# Altium PCB CW342_PCB.PcbDoc (part 3 of 3)
Units mil, origin at the board's own origin, x right, y up, seen from the top; angles counter-clockwise.
Board outline 3740.34 x 4080.75 mil, 4 copper layers (Top Layer, Layer 2 (GND), Layer 3, Bottom Layer), stack 23.756 mil thick; 89 components, 152 nets, 1082 pads, 424 vias.
Unrouted connection lines stored in the file: 58.
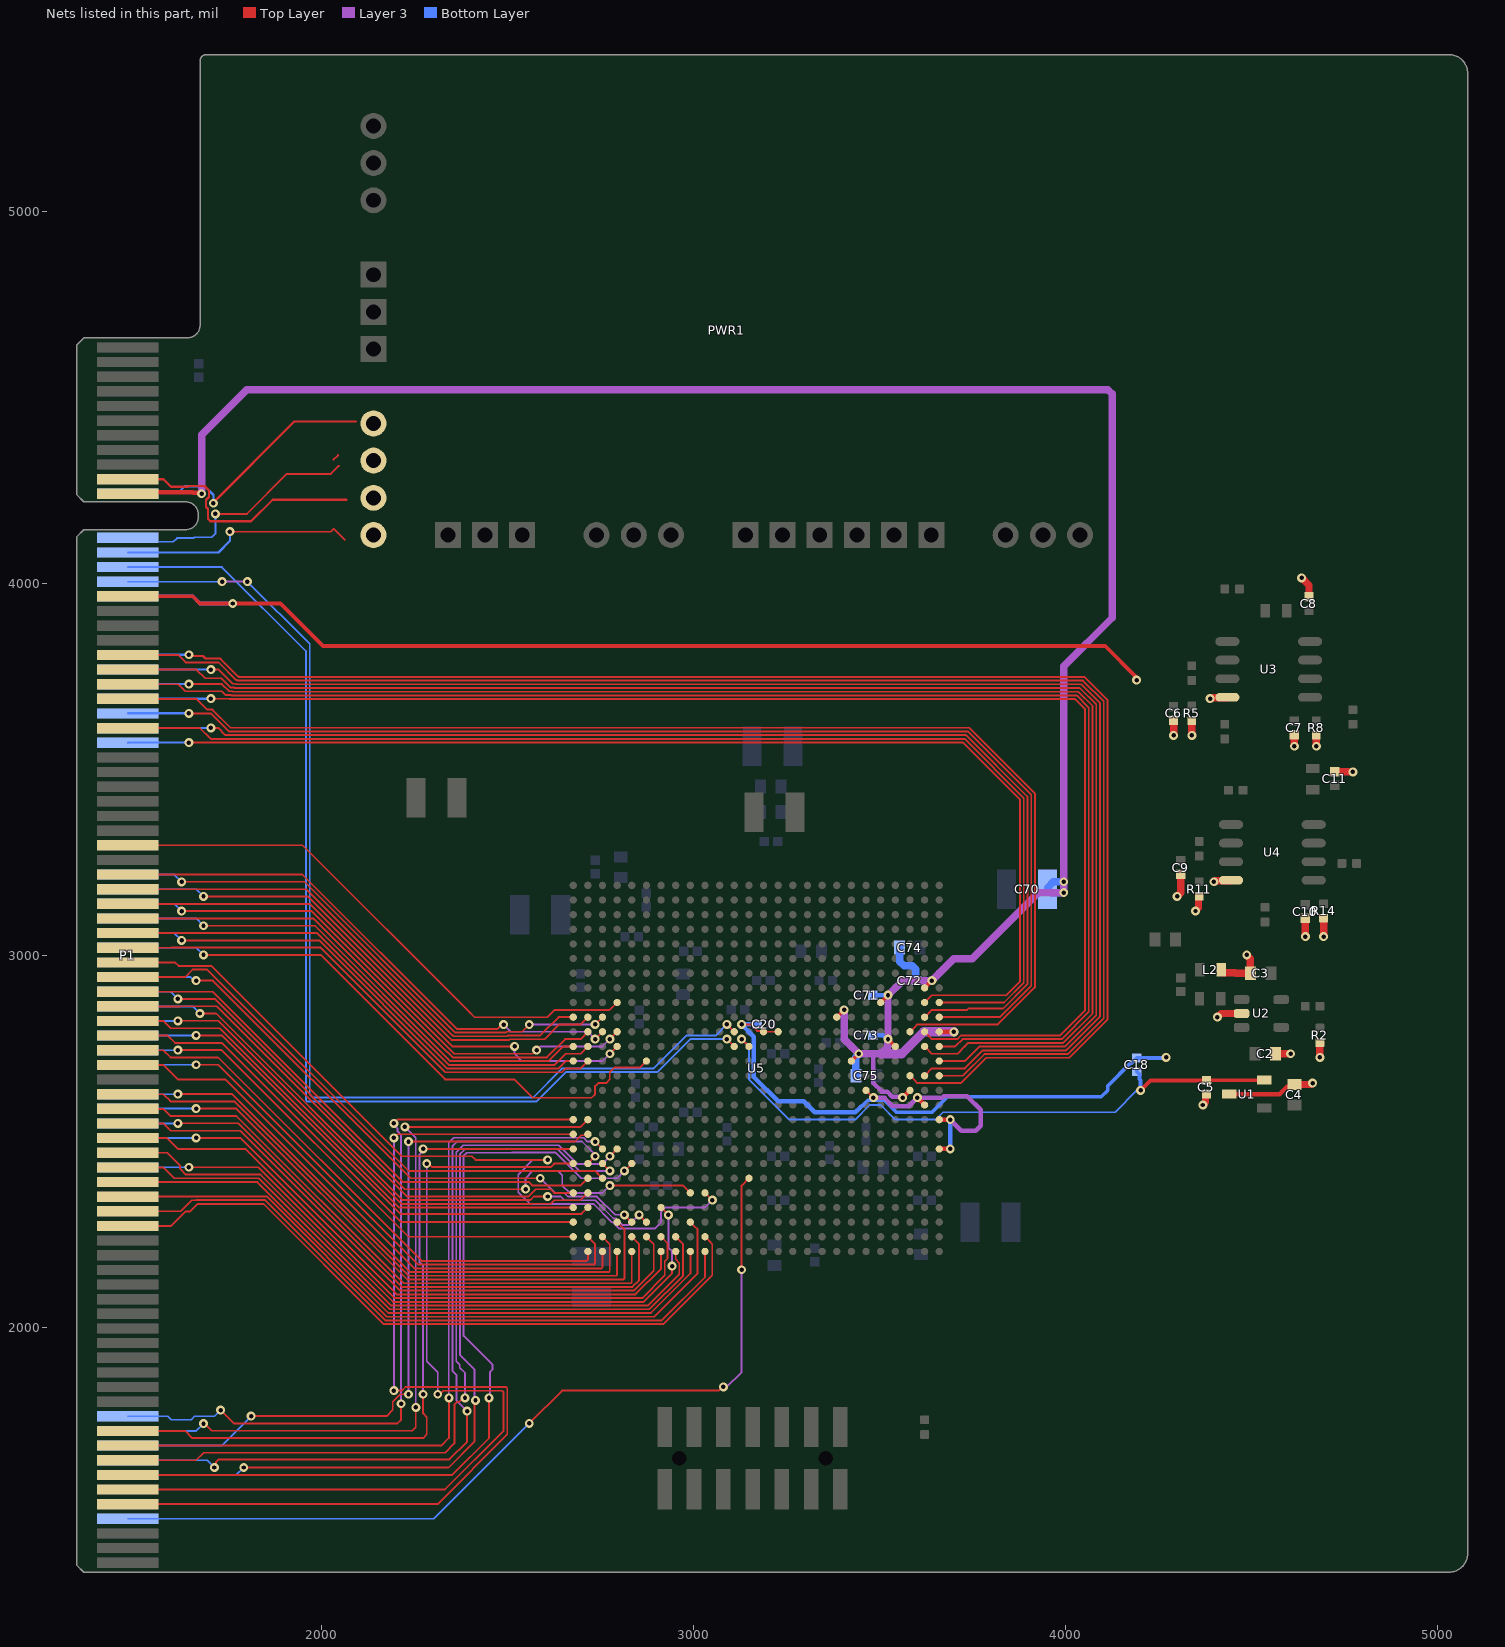
[diagram p5: the nets of this part, all layers, seen from the top]

## Via types
v1: diameter 24, hole 12, Top Layer to Bottom Layer, tented both sides, 423 vias
v2: diameter 24, hole 12, Top Layer to Bottom Layer, 1 vias

## Nets (pads, with @x,y where several pads share a name; then routed paths per layer and width w, separated by ;. In a path a pad name is that pad's centre, name@x,y a point inside that pad or via, vN(x,y) a via of type N, cw(c..) or ccw(c..) an arc to the next point about the centre after c; other vN are vias at no path point) (continued)
OT_IOB4: P1.A20 U5.C14 | length 4153.5
  Top Layer w5: 1729.87,3796.79 1775.72,3750.94 1777.47,3750.94 1778.73,3749.68 4051.7,3749.68 4113.54,3687.85 4113.54,2827.9 4011.07,2725.43 3787.18,2725.43 3719.23,2657.48 3602.36,2657.48 3594.94,2664.9 U5.C14@3582.68,2677.17
  Top Layer w6: v1(1643.7,3809.06) 1647.14,3805.61 1681.51,3805.61 1688.19,3798.93 1727.73,3798.93 1729.87,3796.79
  Bottom Layer w6: P1.A20@1480,3808.62 1480.43,3809.06 v1(1643.7,3809.06)
OT_IOB5: P1.B20 U5.A14 | length 4033.2
  Top Layer w5: P1.B20@1480,3808.62 1614.61,3808.62 1634.8,3788.43 1723.39,3788.43 1770.87,3740.94 1773.33,3740.94 1774.59,3739.68 4047.56,3739.68 4103.54,3683.7 4103.54,2832.04 4006.93,2735.43 3783.04,2735.43 3724.77,2677.17 U5.A14@3661.42,2677.17
OT_IOB6: P1.A21 U5.B14 | length 4032.1
  Top Layer w5: v1(1702.76,3768.93) 1703.52,3769.68 1723.07,3769.68 1761.81,3730.94 1769.19,3730.94 1770.45,3729.68 4043.42,3729.68 4093.54,3679.56 4093.54,2836.19 4002.79,2745.43 3778.9,2745.43 3730.32,2696.85 3641.73,2696.85 U5.B14@3622.05,2677.17
  Bottom Layer w6: P1.A21@1480,3769.25 1702.43,3769.25 v1(1702.76,3768.93)
OT_IOB7: P1.B21 U5.A13 | length 3950.9
  Top Layer w5: P1.B21@1480,3769.25 1663.98,3769.25 1687.21,3746.02 1731.04,3746.02 1756.11,3720.94 1765.04,3720.94 1766.3,3719.68 4039.28,3719.68 4083.54,3675.42 4083.54,2840.33 3998.65,2755.43 3769.21,2755.43 3730.32,2716.54 U5.A13@3661.42,2716.54
OT_IOB8: P1.A22 U5.B12 | length 3949.5
  Top Layer w5: v1(1643.7,3730.32) 1732.6,3730.32 1751.97,3710.94 1760.9,3710.94 1762.16,3709.68 4035.13,3709.68 4073.54,3671.28 4073.54,2844.47 3994.51,2765.43 3739.84,2765.43 3730.32,2755.91 3710.63,2736.22 3641.73,2736.22 U5.B12@3622.05,2755.91
  Bottom Layer w6: P1.A22@1480,3729.88 1480.43,3730.32 v1(1643.7,3730.32)
OT_IOB9: P1.B22 U5.A12 | length 3868.6
  Top Layer w5: P1.B22@1480,3729.88 1614.61,3729.88 1633.67,3710.82 1732.26,3710.82 1742.13,3700.94 1756.76,3700.94 1758.02,3699.68 4030.99,3699.68 4063.54,3667.13 4063.54,2848.61 3990.36,2775.43 3724.02,2775.43 3704.49,2755.91 U5.A12@3661.42,2755.91
OT_IOB10: P1.A23 U5.B11 | length 3874.9
  Top Layer w5: v1(1702.76,3690.94) 1752.62,3690.94 1753.88,3689.68 4026.85,3689.68 4053.54,3662.99 4053.54,2852.76 3986.22,2785.43 3719.88,2785.43 3710.04,2775.59 3641.73,2775.59 3634.31,2783.01 U5.B11@3622.05,2795.28
  Bottom Layer w6: P1.A23@1485.51,3685 P1.A23@1480,3690.51 1480.43,3690.94 v1(1702.76,3690.94)
OT_IOB11: P1.B23 U5.C11 | length 3450.9
  Top Layer w5: P1.B23@1480,3690.51 1663.82,3690.51 1692.76,3661.57 1706.9,3661.57 1755.64,3612.83 3742.05,3612.83 3918.61,3436.27 3918.61,2914.67 3818.9,2814.96 3602.36,2814.96 3594.94,2807.54 U5.C11@3582.68,2795.28
OT_IOB12: P1.A24 U5.A10 | length 3315.1
  Top Layer w5: v1(1643.7,3651.57) 1702.76,3651.57 1751.5,3602.83 3737.91,3602.83 3908.61,3432.13 3908.61,2918.82 3840.64,2850.84 3824.44,2834.65 U5.A10@3661.42,2834.65
  Bottom Layer w6: P1.A24@1480,3651.14 1480.43,3651.57 v1(1643.7,3651.57)
OT_IOC0: P1.A50 U5.AD25 | length 1595.4
  Top Layer w5: v1(1614.17,2627.95) 1760.57,2627.95 2239.33,2149.19 2772.66,2149.19 2775.59,2152.12 2775.59,2224.41 U5.AD25@2755.91,2244.09
  Bottom Layer w5: P1.A50@1480,2627.52 1613.74,2627.52 v1(1614.17,2627.95)
OT_IOC1: P1.B50 U5.AC26 | length 1581.4
  Top Layer w5: P1.B50@1480,2627.52 1575.24,2627.52 1594.67,2608.08 1766.3,2608.08 2235.19,2139.19 2792.35,2139.19 2795.28,2142.12 U5.AC26@2795.28,2204.72
OT_IOC2: P1.A51 U5.AC24 | length 1686.1
  Top Layer w5: v1(1663.39,2588.58) 1771.65,2588.58 2231.05,2129.19 2812.03,2129.19 2814.96,2132.12 2814.96,2263.78 U5.AC24@2795.28,2283.46
  Bottom Layer w5: P1.A51@1480,2588.15 1480.43,2588.58 v1(1663.39,2588.58)
OT_IOC3: P1.B51 U5.AB26 | length 1632.7
  Top Layer w5: P1.B51@1480,2588.15 1575.24,2588.15 1594.67,2568.71 1771.84,2568.71 2221.36,2119.19 2831.72,2119.19 2834.65,2122.12 U5.AB26@2834.65,2204.72
OT_IOC4: P1.A52 U5.AB25 | length 1689.3
  Top Layer w5: v1(1614.17,2549.21) 1775.95,2549.21 2215.98,2109.19 2836.29,2109.19 2854.33,2127.23 2854.33,2224.41 U5.AB25@2834.65,2244.09
  Bottom Layer w5: P1.A52@1480,2548.78 1613.74,2548.78 v1(1614.17,2549.21)
OT_IOC5: P1.B52 U5.AA25 | length 1721.8
  Top Layer w5: P1.B52@1480,2548.78 1575.24,2548.78 1594.67,2529.34 1781.68,2529.34 2211.83,2099.19 2840.43,2099.19 2893.7,2152.46 2893.7,2224.41 U5.AA25@2874.02,2244.09
OT_IOC6: P1.B53 U5.Y25 | length 1760.9
  Top Layer w5: P1.B53@1480,2509.41 1585.08,2509.41 1614.17,2480.32 1795.64,2480.32 2196.76,2079.19 2862.29,2079.19 2923.41,2140.31 2923.41,2177.89 2930.73,2185.2 2930.73,2226.75 U5.Y25@2913.39,2244.09
OT_IOC7: P1.B54 U5.W26 | length 1757.1
  Top Layer w5: P1.B54@1480,2470.04 1585.08,2470.04 1619.98,2435.14 1619.98,2427.25 1635.93,2411.3 1836.37,2411.3 2188.48,2059.19 2877.65,2059.19 2962.41,2143.96 2962.41,2173.43 2952.76,2183.09 U5.W26@2952.76,2204.72
OT_IOC8: P1.B55 U5.W25 | length 1800.4
  Top Layer w5: P1.B55@1480,2430.67 1575.24,2430.67 1604.61,2401.3 1832.23,2401.3 2184.34,2049.19 2881.79,2049.19 2972.44,2139.84 2972.44,2224.41 2965.02,2231.83 U5.W25@2952.76,2244.09
OT_IOC9: P1.B56 U5.V26 | length 1761.3
  Top Layer w5: P1.B56@1480,2391.3 1828.08,2391.3 2180.2,2039.19 2885.93,2039.19 2992.13,2145.38 U5.V26@2992.13,2204.72
OT_IOC10: P1.B57 U5.V24 | length 1860.2
  Top Layer w5: P1.B57@1480,2351.93 1605.85,2351.93 1606.22,2352.3 1659.02,2352.3 1659.24,2352.52 1852.72,2352.52 2176.05,2029.19 2895.33,2029.19 3011.81,2145.67 3011.81,2263.78 3004.39,2271.2 U5.V24@2992.13,2283.46
OT_IOC11: P1.B58 U5.U26 | length 1815.4
  Top Layer w5: P1.B58@1480,2312.56 1621.63,2312.56 1651.37,2342.3 1663.17,2342.3 1663.39,2342.52 1848.58,2342.52 2171.91,2019.19 2915.39,2019.19 3031.5,2135.29 U5.U26@3031.5,2204.72
OT_IOC12: P1.B59 U5.U25 | length 1895.6
  Top Layer w5: P1.B59@1480,2273.19 1596.4,2273.19 1635.53,2312.32 1647.33,2312.32 1667.53,2332.52 1844.44,2332.52 2167.77,2009.19 2919.54,2009.19 3051.18,2140.83 3051.18,2224.41 3043.76,2231.83 U5.U25@3031.5,2244.09
OT_IOR0_USR_DBG_TMS: P1.A42 U5.AB24 | length 1627.6
  Top Layer w5: v1(1663.39,2933.07) 1708.3,2933.07 2239.79,2401.57 v1(2588.58,2401.57) ; v1(2814.96,2303.15) U5.AB24@2834.65,2283.46
  Layer 3 w5: v1(2588.58,2401.57) 2627.8,2362.36 2653.02,2362.36 2663.18,2352.2 2740.68,2352.2 2789.73,2303.15 v1(2814.96,2303.15)
  Bottom Layer w5: P1.A42@1480,2942.48 1648.84,2942.48 1658.24,2933.07 v1(1663.39,2933.07)
OT_IOR1_USR_DBG_TDO: P1.B42 U5.AD21 | length 1516.6
  Top Layer w5: P1.B42@1480,2942.48 1633.42,2942.48 1653.54,2962.6 1692.91,2962.6 2234.25,2421.26 2736.22,2421.26 2743.64,2413.84 U5.AD21@2755.91,2401.57
OT_IOR2_USR_DBG_TDI: P1.A43 U5.V22 | length 1826.8
  Top Layer w5: v1(1614.17,2883.61) 1712.85,2883.61 2224.41,2372.05 v1(2549.21,2372.05) ; v1(2775.59,2381.89) 2972.44,2381.89 U5.V22@2992.13,2362.2
  Layer 3 w5: v1(2549.21,2372.05) 2549.21,2401.57 2568.9,2421.26 2635.84,2421.26 2647.64,2409.47 2647.64,2381.89 2667.32,2362.2 2755.91,2362.2 v1(2775.59,2381.89)
  Bottom Layer w5: P1.A43@1480,2903.11 1594.92,2903.11 1614.17,2883.86 v1(1614.17,2883.61)
OT_IOR3_USR_DBG_TCK: P1.B43 U5.AE21 | length 1460.4
  Top Layer w5: P1.B43@1480,2903.11 1707.49,2903.11 2219.05,2391.55 2557.29,2391.55 2566.76,2382.07 2697.04,2382.07 U5.AE21@2716.54,2401.57
OT_IOR4_USR_DBG_TRST: P1.A44 U5.AA24 | length 1665
  Top Layer w5: v1(1673.23,2844.49) 1716.9,2844.49 2218.84,2342.55 2561.43,2342.55 2571.25,2352.36 v1(2608.27,2352.36) ; v1(2854.33,2303.15) U5.AA24@2874.02,2283.46
  Layer 3 w5: v1(2608.27,2352.36) 2643.34,2352.36 2653.5,2342.2 2736.54,2342.2 2785.46,2293.28 2787.81,2293.28 2787.94,2293.15 2792.09,2293.15 2809.26,2275.98 2827.16,2275.98 v1(2854.33,2303.15)
  Bottom Layer w5: P1.A44@1480,2863.74 1653.98,2863.74 v1(1673.23,2844.49)
OT_IOR5: P1.B44 U5.AF22 | length 1421.1
  Top Layer w5: P1.B44@1480,2863.74 1620.62,2863.74 1620.87,2863.99 1718.33,2863.99 2229.77,2352.55 2557.29,2352.55 2576.6,2371.86 2616.34,2371.86 2626,2362.2 U5.AF22@2677.17,2362.2
OT_IOR6: P1.A45 U5.AE22 | length 1452.9
  Top Layer w5: v1(1614.17,2824.8) 1722.44,2824.8 2214.7,2332.55 2565.57,2332.55 2565.89,2332.86 2616.34,2332.86 2625.84,2342.36 2696.69,2342.36 2704.27,2349.94 U5.AE22@2716.54,2362.2
  Bottom Layer w5: P1.A45@1480,2824.37 1613.74,2824.37 v1(1614.17,2824.8)
OT_IOR7: P1.B45 U5.AF23 | length 1405.1
  Top Layer w5: P1.B45@1480,2824.37 1575.24,2824.37 1594.67,2804.93 1727.08,2804.93 2209.47,2322.55 2599.4,2322.55 2599.69,2322.83 U5.AF23@2677.17,2322.83
OT_IOR8: P1.A46 U5.AE23 | length 1442.7
  Top Layer w5: v1(1663.39,2785.43) 1732.44,2785.43 2212.38,2305.49 2699.19,2305.49 U5.AE23@2716.54,2322.83
  Bottom Layer w5: P1.A46@1480,2785 1603.9,2785 1604.33,2785.43 v1(1663.39,2785.43)
OT_IOR9: P1.B46 U5.AF24 | length 1404.9
  Top Layer w5: P1.B46@1480,2785 1587.03,2785 1606.47,2765.56 1732.63,2765.56 2214.72,2283.46 U5.AF24@2677.17,2283.46
OT_IOR10: P1.A47 U5.AF25 | length 1405.3
  Top Layer w5: v1(1614.17,2746.06) 1732.28,2746.06 2234.25,2244.09 U5.AF25@2677.17,2244.09
  Bottom Layer w5: P1.A47@1480,2745.63 1613.74,2745.63 v1(1614.17,2746.06)
OT_IOR11: P1.B47 U5.AE26 | length 1495
  Top Layer w5: P1.B47@1480,2745.63 1575.24,2745.63 1594.67,2726.19 1722.63,2726.19 2269.63,2179.19 2713.61,2179.19 2716.54,2182.12 U5.AE26@2716.54,2204.72
OT_IOR12: P1.A48 U5.AE25 | length 1560.4
  Top Layer w5: v1(1663.39,2706.69) 1722.44,2706.69 2259.94,2169.19 2733.29,2169.19 2736.22,2172.12 2736.22,2224.41 U5.AE25@2716.54,2244.09
  Bottom Layer w5: P1.A48@1480,2706.26 1480.43,2706.69 v1(1663.39,2706.69)
OT_IOR13: P1.B48 U5.AD26 | length 1526.6
  Top Layer w5: P1.B48@1499.69,2706.26 1575.24,2706.26 1614.17,2667.32 1742.13,2667.32 2250.26,2159.19 2752.98,2159.19 2755.91,2162.12 U5.AD26@2755.91,2204.72
OT_PORN: P1.A53 U5.Y26 | length 1683
  Top Layer w5: v1(1663.39,2509.84) 1781.5,2509.84 2202.15,2089.19 2844.58,2089.19 2913.39,2158 U5.Y26@2913.39,2204.72
  Bottom Layer w5: P1.A53@1480,2509.41 1480.43,2509.84 v1(1663.39,2509.84)
OT_SPI_DEV_CLK: P1.A35 U5.AD10 | length 1469.3
  Top Layer w5: v1(1624.02,3198.57) 1954.61,3198.57 2360.05,2793.13 2496.03,2793.13 2498.31,2795.41 2539.5,2795.41 2558.93,2814.83 v1(2559.06,2814.83) ; v1(2736.22,2814.96) U5.AD10@2755.91,2834.65
  Layer 3 w5: v1(2559.06,2814.83) 2559.12,2814.9 2736.16,2814.9 v1(2736.22,2814.96)
  Bottom Layer w5: P1.A35@1480,3218.07 1604.76,3218.07 1624.02,3198.82 v1(1624.02,3198.57)
OT_SPI_DEV_CS_L: P1.A40 U5.AA13 | length 1625.8
  Top Layer w5: v1(1683.07,3001.97) 1998.03,3001.97 2332.68,2667.32 2519.27,2667.32 2519.68,2666.91 2521.7,2664.89 2529.32,2657.27 2568.48,2618.11 2726.38,2618.11 2736.22,2627.95 2736.22,2649.29 2744.41,2657.48 2765.75,2657.48 2775.59,2667.32 2775.59,2687.01 2787.78,2699.19 2856.67,2699.19 U5.AA13@2874.02,2716.54
  Bottom Layer w5: P1.A40@1480,3021.22 1663.82,3021.22 v1(1683.07,3001.97)
OT_SPI_DEV_D0: P1.A36 U5.AE10 | length 1430
  Top Layer w5: v1(1683.07,3159.2) 1963.21,3159.2 2344.67,2777.74 2345.91,2777.74 2350.53,2773.13 2504.31,2773.13 2506.59,2775.41 2600.19,2775.41 2639.75,2814.96 2696.85,2814.96 U5.AE10@2716.54,2834.65
  Bottom Layer w5: P1.A36@1480,3178.7 1663.57,3178.7 v1(1683.07,3159.2)
OT_SPI_DEV_D1: P1.A37 U5.AC11 | length 1506.7
  Top Layer w5: v1(1624.02,3119.83) 1974.3,3119.83 2357.72,2736.41 2569.08,2736.41 v1(2578.74,2746.06) ; v1(2775.59,2775.59) U5.AC11@2795.28,2795.28
  Layer 3 w5: v1(2578.74,2746.06) 2588.58,2755.91 2755.91,2755.91 v1(2775.59,2775.59)
  Bottom Layer w5: P1.A37@1480,3139.33 1604.76,3139.33 1624.02,3120.08 v1(1624.02,3119.83)
OT_SPI_DEV_D2: P1.A38 U5.AF12 | length 1372.4
  Top Layer w5: v1(1683.07,3080.46) 1982.89,3080.46 2346.95,2716.41 2610.49,2716.41 2649.99,2755.91 U5.AF12@2677.17,2755.91
  Bottom Layer w5: P1.A38@1480,3099.96 1663.57,3099.96 v1(1683.07,3080.46)
OT_SPI_DEV_D3: P1.A39 U5.AF13 | length 1356.5
  Top Layer w5: v1(1624.02,3041.09) 1993.98,3041.09 2338.67,2696.41 2637.35,2696.41 2657.48,2716.54 U5.AF13@2677.17,2716.54
  Bottom Layer w5: P1.A39@1480,3060.59 1604.76,3060.59 1624.02,3041.34 v1(1624.02,3041.09)
OT_SPI_HOST_CLK: P1.B35 U5.AD11 | length 1477
  Top Layer w5: P1.B35@1480,3218.07 1949.25,3218.07 2364.2,2803.13 2474.29,2803.13 2485.99,2814.83 v1(2490.16,2814.83) ; v1(2736.22,2775.59) U5.AD11@2755.91,2795.28
  Layer 3 w5: v1(2490.16,2814.83) 2509.71,2795.28 2716.54,2795.28 v1(2736.22,2775.59)
OT_SPI_HOST_CS_L: P1.B40 U5.AE13 | length 1387.9
  Top Layer w5: P1.B40@1480,3021.22 1596.01,3021.22 1596.26,3021.47 1998.22,3021.47 2333.28,2686.41 2647.04,2686.41 2657.48,2696.85 2696.85,2696.85 U5.AE13@2716.54,2716.54
OT_SPI_HOST_D0: P1.B36 U5.AF10 | length 1382.4
  Top Layer w5: P1.B36@1480,3178.7 1959.09,3178.7 2352.36,2785.43 2353.61,2785.43 2355.91,2783.13 2500.17,2783.13 2502.45,2785.41 2588.56,2785.41 2637.8,2834.65 U5.AF10@2677.17,2834.65
OT_SPI_HOST_D1: P1.B37 U5.AC12 | length 1518.2
  Top Layer w5: P1.B37@1480,3139.33 1968.94,3139.33 2352.36,2755.91 v1(2519.68,2755.91) ; v1(2775.59,2736.22) U5.AC12@2795.28,2755.91
  Layer 3 w5: v1(2519.68,2755.91) 2519.68,2736.22 2539.37,2716.54 2755.91,2716.54 v1(2775.59,2736.22)
OT_SPI_HOST_D2: P1.B38 U5.AE11 | length 1419.8
  Top Layer w5: P1.B38@1480,3099.96 1978.78,3099.96 2337.27,2741.47 2338.52,2741.47 2353.58,2726.41 2606.34,2726.41 2655.53,2775.59 2696.85,2775.59 U5.AE11@2716.54,2795.28
OT_SPI_HOST_D3: P1.B39 U5.AE12 | length 1403.7
  Top Layer w5: P1.B39@1480,3060.59 1988.62,3060.59 2342.81,2706.41 2627.67,2706.41 2657.48,2736.22 2696.85,2736.22 U5.AE12@2716.54,2755.91
PGOOD_VCCINT: P1.B10 PWR1.9 | length 712.6
  Top Layer w6: P1.B10@1480,4281.06 1575.61,4281.06 1595.61,4261.06 1640.84,4261.06 1642.78,4263 1685.49,4263 1698,4250.49 1698,4233.5 1689.71,4225.21 1689.71,4206.4 1695,4201.11 1695,4174.51 1701.51,4168 1811,4168 1869,4226 2067,4226
PLL_CLK1: P1.A55 U5.Y23 | length 1834.1
  Top Layer w5: v1(1643.7,2431.1) 1830.71,2431.1 2192.62,2069.19 2866.43,2069.19 2942.91,2145.67 v1(2942.91,2165.35) ; U5.Y23@2913.39,2322.83 v1(2933.07,2303.15)
  Layer 3 w5: v1(2933.07,2303.15) 2933.07,2214.57 2942.91,2204.72 v1(2942.91,2165.35)
  Bottom Layer w5: P1.A55@1480,2430.67 1480.43,2431.1 v1(1643.7,2431.1)
PLL_CLK2: P1.B33 U5.AC9 | length 1523.3
  Top Layer w5: P1.B33@1480,3296.81 1949.25,3296.81 2398.47,2847.6 2411.73,2834.33 2607.95,2834.33 2627.8,2854.17 2775.43,2854.17 U5.AC9@2795.28,2874.02
PMOD2_IO4_3V3: P1.A25 U5.B10 | length 3313.3
  Top Layer w5: v1(1702.76,3612.2) 1722.76,3612.2 1742.13,3592.83 3733.76,3592.83 3898.61,3427.99 3898.61,2922.96 3833.57,2857.92 3739.44,2857.92 3735.86,2854.33 3641.73,2854.33 3634.31,2846.91 U5.B10@3622.05,2834.65
  Bottom Layer w6: P1.A25@1480,3611.77 1702.32,3611.77 v1(1702.76,3612.2)
PMOD2_IO7_3V3: P1.B25 U5.A9 | length 3232.4
  Top Layer w5: P1.B25@1480,3611.77 1673.66,3611.77 1702.6,3582.83 3729.62,3582.83 3888.61,3423.85 3888.61,2927.1 3835.53,2874.02 U5.A9@3661.42,2874.02
PMOD2_IO8_3V3: P1.A26 U5.B9 | length 3230.9
  Top Layer w5: v1(1643.7,3572.83) 3725.48,3572.83 3878.61,3419.7 3878.61,2931.24 3841.07,2893.7 3641.73,2893.7 3634.31,2886.28 U5.B9@3622.05,2874.02
  Bottom Layer w6: P1.A26@1480,3572.4 1480.43,3572.83 v1(1643.7,3572.83)
PWR_EN: P1.A13 PWR1.10 | length 636.5
  Top Layer w5: v1(1754,4140) 2025,4140 2033,4148 2063,4118
  Bottom Layer w6: P1.A13@1480,4084.21 1723.21,4084.21 1754,4115 v1(1754,4140)
USB_CLK0: P1.A79 U5.P21 | length 2345.3
  Top Layer w5: v1(2559.06,1742.13) 2647.48,1830.55 3068.28,1830.55 3078.28,1840.55 v1(3080.71,1840.55) ; v1(3129.92,2155.51) 3129.92,2381.89 U5.P21@3149.61,2401.57
  Layer 3 w5: v1(3080.71,1840.55) 3083.56,1837.7 3087.7,1837.7 3129.92,1879.92 v1(3129.92,2155.51)
  Bottom Layer w5: P1.A79@1480,1485.79 2302.72,1485.79 v1(2559.06,1742.13)
USR_DBG_nRST: P1.B41 U5.U22 | length 2128.6
  Top Layer w5: P1.B41@1480,2981.85 1480.39,2981.46 1607.1,2981.46 1615.94,2972.63 1704.52,2972.63 2216.52,2460.63 2404.91,2460.63 2414.73,2450.82 v1(2608.27,2450.82) ; U5.U22@3031.5,2362.2 v1(3051.18,2342.52)
  Layer 3 w5: v1(2608.27,2450.82) 2568.93,2450.82 2529.53,2411.42 2529.53,2364.16 2561.48,2332.2 2732.39,2332.2 2781.32,2283.28 2783.67,2283.28 2800.97,2265.98 2895.9,2265.98 2913.39,2283.46 2913.39,2311.04 2925.36,2323.02 3031.68,2323.02 v1(3051.18,2342.52)
USRUSB_OE: P1.B77 U5.AF20 | length 2396
  Top Layer w5: P1.B77@1480,1564.53 2332.24,1564.53 2489.5,1721.78 2489.5,1827.31 2486.57,1830.24 2327.66,1830.24 2318.13,1820.71 v1(2312.99,1820.71) ; v1(2283.46,2440.94) 2288.61,2440.94 2298.24,2431.32 2616.34,2431.32 2625.97,2440.94 U5.AF20@2677.17,2440.94
  Layer 3 w5: v1(2283.46,2440.94) 2283.46,1909.45 2312.99,1879.92 v1(2312.99,1820.71)
USRUSB_PWREN: P1.A72 U5.AF17 | length 2059.7
  Top Layer w5: v1(1729.16,1777.91) 1764.94,1742.13 2204.72,1742.13 2214.57,1751.97 v1(2214.57,1795.15) ; v1(2194.88,2549.21) 2204.73,2559.06 U5.AF17@2677.17,2559.06
  Layer 3 w5: v1(2194.88,2549.21) 2194.88,2544.07 2204.91,2534.04 2204.91,2527.39 2214.57,2517.73 v1(2214.57,1795.15)
  Bottom Layer w5: P1.A72@1480,1761.38 1586.6,1761.38 1595.83,1752.15 1649.61,1752.15 1658.84,1761.38 1712.63,1761.38 v1(1729.16,1777.91)
USRUSB_RCV: P1.A76 U5.AD20 | length 2221.5
  Top Layer w5: v1(1791.34,1623.77) 2342.27,1623.77 2411.42,1692.91 2411.42,1801.03 v1(2414.43,1804.05) ; U5.AD20@2755.91,2440.94 v1(2775.59,2421.26)
  Layer 3 w5: v1(2414.43,1804.05) 2411.42,1807.06 2411.42,1887.81 2372.52,1926.71 2372.52,2466.33 2386.35,2480.16 2507.87,2480.16 2508.02,2480.32 2634.01,2480.32 2693.06,2421.26 v1(2775.59,2421.26)
  Bottom Layer w5: P1.A76@1480,1603.9 1771.22,1603.9 1791.09,1623.77 v1(1791.34,1623.77)
USRUSB_SOFTCN: P1.B75 U5.AC19 | length 2185.3
  Top Layer w5: P1.B75@1480,1643.27 1662.95,1643.27 1683.23,1663.54 2332.83,1663.54 2357.71,1688.42 2357.71,1792.83 2365.36,1800.48 2370.82,1800.48 2381.08,1810.74 v1(2386.22,1810.74) ; v1(2775.59,2460.63) U5.AC19@2795.28,2480.32
  Layer 3 w5: v1(2386.22,1810.74) 2386.22,1878.11 2372.05,1892.28 2372.05,1899.61 2362.52,1909.13 2362.52,2470.79 2382.05,2490.32 2638.15,2490.32 2688.77,2439.69 2754.65,2439.69 v1(2775.59,2460.63)
USRUSB_SPD: P1.B76 U5.AB20 | length 2307.9
  Top Layer w5: P1.B76@1480,1603.9 2351.93,1603.9 2450.79,1702.76 v1(2450.79,1810.71) ; v1(2814.96,2421.26) U5.AB20@2834.65,2440.94
  Layer 3 w5: v1(2450.79,1810.71) 2452.95,1812.87 2452.95,1879.74 2460.63,1887.41 2460.63,1899.61 2382.52,1977.72 2382.52,2462.19 2390.49,2470.16 2512.01,2470.16 2512.16,2470.32 2629.87,2470.32 2698.61,2401.57 2795.28,2401.57 v1(2814.96,2421.26)
USRUSB_SUS: P1.B78 U5.AF18 | length 2698.1
  Top Layer w5: P1.B78@1480,1525.16 2312.56,1525.16 2500,1712.6 2500,1837.31 2497.07,1840.24 2226.2,1840.24 2216.68,1830.71 v1(2194.88,1830.71) ; v1(2194.88,2509.84) 2204.73,2519.69 U5.AF18@2677.17,2519.69
  Layer 3 w5: v1(2194.88,1830.71) v1(2194.88,2509.84)
USRUSB_VBUS_DETECT: P1.A73 U5.AE17 | length 2113.9
  Top Layer w5: v1(1683.07,1741.88) 1685.93,1741.88 1705.37,1722.44 2244.09,1722.44 2253.94,1732.28 v1(2253.94,1785.3) ; v1(2224.41,2539.37) 2696.85,2539.37 U5.AE17@2716.54,2559.06
  Layer 3 w5: v1(2224.41,2539.37) 2253.94,2509.84 v1(2253.94,1785.3)
  Bottom Layer w5: P1.A73@1480,1722.01 1663.2,1722.01 v1(1683.07,1741.88)
USRUSB_VM: P1.A74 U5.AE18 | length 1993.8
  Top Layer w5: v1(1811.02,1761.81) 2175.2,1761.81 2192.06,1778.67 2192.06,1800.21 2212.55,1820.71 v1(2234.25,1820.71) ; v1(2234.25,2500) 2682.01,2500 2699.19,2517.19 2714.04,2517.19 U5.AE18@2716.54,2519.69
  Layer 3 w5: v1(2234.25,1820.71) v1(2234.25,2500)
  Bottom Layer w5: P1.A74@1480,1682.64 1731.85,1682.64 v1(1811.02,1761.81)
USRUSB_VMO: P1.B74 U5.AD19 | length 2097.1
  Top Layer w5: P1.B74@1480,1682.64 2322.4,1682.64 2343.23,1703.47 v1(2343.23,1810.71) ; v1(2736.22,2500) U5.AD19@2755.91,2480.32
  Layer 3 w5: v1(2343.23,1810.71) 2342.52,1811.42 2342.52,2497.07 2355.76,2510.32 2704.98,2510.32 2715.29,2500 v1(2736.22,2500)
USRUSB_VP: P1.A75 U5.AE20 | length 2200.9
  Top Layer w5: v1(1712.6,1623.77) 1716.23,1627.4 1716.23,1637.49 1724.3,1645.56 2344.38,1645.56 2391.73,1692.91 v1(2391.73,1775.46) ; U5.AE20@2716.54,2440.94 v1(2736.22,2460.63)
  Layer 3 w5: v1(2391.73,1775.46) 2362.99,1804.2 2362.99,1873.12 2352.52,1883.59 2352.52,2487.07 2365.76,2500.32 2700.83,2500.32 2736.22,2464.93 v1(2736.22,2460.63)
  Bottom Layer w5: P1.A75@1480,1643.27 1693.35,1643.27 1712.6,1624.02 v1(1712.6,1623.77)
USRUSB_VPO: P1.B73 U5.AF19 | length 1998.9
  Top Layer w5: P1.B73@1480,1722.01 1633.86,1722.01 1653.11,1702.76 2273.62,1702.76 2283.46,1712.6 2283.46,1759.16 2273.62,1769 v1(2273.62,1820.71) ; v1(2273.62,2480.32) U5.AF19@2677.17,2480.32
  Layer 3 w5: v1(2273.62,1820.71) 2273.46,1820.87 2273.46,2165.7 2263.96,2175.2 2263.96,2465.52 2273.62,2475.17 v1(2273.62,2480.32)
VCCINT_SCL: P1.A12 PWR1.8 | length 616.9
  Top Layer w5: v1(1715,4188) 1800,4188 1907.5,4295.5 2025.5,4295.5 2047,4317 ; 2032,4333 2045,4346
  Bottom Layer w5: 1564,4113 1602,4113 1611.9,4122.9 1656.31,4122.9 1658.38,4124.97 1704.97,4124.97 1715,4135 v1(1715,4188)
VCCINT_SDA: P1.A11 PWR1.7 | length 659
  Top Layer w6: v1(1709.71,4216.51) 1709.71,4218.43 1927.28,4436 2093,4436
  Bottom Layer w6: 1564,4247 1617.64,4247 1632.64,4262 1686.28,4262 1709.71,4238.57 v1(1709.71,4216.51)
VCCUSERIOB: C70.1 C71.1 C72.1 C73.1 C74.1 C75.1 P1.B11 U5.A11 U5.B8 U5.C15 U5.D12 U5.E9 U5.G13 U5.H10 | length 6134.1
  Top Layer w10: U5.H10@3385.83,2834.65 v1(3405.51,2854.33) ; U5.G13@3425.2,2716.54 v1(3444.88,2736.22) ; U5.E9@3503.94,2874.02 v1(3523.62,2893.7) ; v1(3523.62,2775.59) U5.D12@3543.31,2755.91 ; U5.B8@3622.05,2913.39 v1(3641.73,2933.07)
  Top Layer w12: P1.B11@1560,4246.2 1654.15,4246.2 1655.62,4244.74 1659.23,4244.74 1659.67,4244.3 1675.7,4244.3 v1(1678,4242) ; v1(3562.99,2618.48) 3563.17,2618.48 3582.5,2637.8 U5.C15@3582.68,2637.8 ; U5.A11@3661.42,2795.28 v1(3700.79,2795.28)
  Layer 3 w12: 3484.25,2736.22 3484.25,2657.48 3507.25,2634.48 3521.45,2634.48 3535.16,2620.77 3560.7,2620.77 v1(3562.99,2618.48)
  Layer 3 w20: v1(1678,4242) 1678,4401 1799,4522 4114.28,4522 4126,4510.28 4126,3908 3996.06,3778.06 v1(3996.06,3198.82) v1(3996.06,3169.29) 3927.17,3169.29 3750,2992.13 3700.79,2992.13 v1(3641.73,2933.07) 3562.99,2933.07 v1(3523.62,2893.7) v1(3523.62,2775.59) 3522.86,2774.83 3522.86,2754.44 3504.64,2736.22 3484.25,2736.22 v1(3444.88,2736.22) 3405.51,2775.59 v1(3405.51,2854.33)
  Layer 3 w25: 3504.64,2736.22 3560.64,2736.22 3619.7,2795.28 v1(3700.79,2795.28)
  Bottom Layer w12: C73.1@3482.68,2785.43 3511.05,2785.43 3520.89,2775.59 v1(3523.62,2775.59) ; C71.1@3482.68,2893.7 v1(3523.62,2893.7) ; C72.1@3600.79,2933.07 v1(3641.73,2933.07)
  Bottom Layer w20: C75.1@3437.01,2677.17 3437.01,2727.26 3444.88,2735.14 v1(3444.88,2736.22) ; C74.1@3555.12,3021.65 3555.12,2984.16 3566.83,2972.44 3589.07,2972.44 3598.19,2963.32 3598.19,2935.67 C72.1@3600.79,2933.07 ; v1(3996.06,3169.29) 3962.6,3169.29 C70.1@3952.76,3179.13 3952.76,3183.23 3968.35,3198.82 v1(3996.06,3198.82)
XADC_DXN: P1.A15 U5.R11 | length 3003.9
  Top Layer w5: v1(3090.55,2814.96) U5.R11@3110.24,2795.28
  Layer 3 w5: v1(1733.03,4005.91) v1(1801.18,4005.91)
  Bottom Layer w5: P1.A15@1480,4005.47 1732.59,4005.47 v1(1733.03,4005.91) ; v1(1801.18,4005.91) 1968.66,3838.43 1968.66,2627.95 1978.35,2618.27 2569.06,2618.27 2647.64,2696.85 2893.54,2696.85 2982.28,2785.59 3061.18,2785.59 v1(3090.55,2814.96)
XADC_DXP: P1.A14 U5.R12 | length 3010.2
  Top Layer w5: v1(3090.55,2775.59) U5.R12@3110.24,2755.91
  Bottom Layer w5: P1.A14@1480,4044.84 1732.72,4044.84 1958.66,3818.9 1958.66,2611.2 1961.59,2608.27 2578.74,2608.27 2657.32,2686.85 2903.39,2686.85 2992.13,2775.59 v1(3090.55,2775.59)
XADC_VREFN: C2.2 C3.2 C4.2 C5.2 C6.2 C7.2 C8.2 C9.2 C10.2 C11.2 C18.2 C20.2 L2.2 P1.A16 P1.B16 R2.2 R5.2 R8.2 R11.2 R14.2 U1.3 U2.2 U3.4 U4.4 U5.A17 U5.A19 U5.B16 U5.F15 U5.M11 U5.N11 | length 6414.7
  Top Layer w5: v1(3129.92,2814.96) 3154.45,2814.96 3171.63,2797.77 3186.48,2797.77 U5.N11@3188.98,2795.28 U5.M11@3228.35,2795.28
  Top Layer w6: U5.F15@3464.57,2637.8 v1(3484.25,2618.11)
  Top Layer w10: P1.B16@1480,3966.1 1653.98,3966.1 1673.23,3946.85 v1(1761.81,3946.85) 1889.76,3946.85 2004.19,3832.43 4107.55,3832.43 4191.99,3747.98 v1(4191.99,3741.08)
  Top Layer w12: v2(3602.36,2618.11) U5.B16@3622.05,2598.43 ; U5.A19@3661.42,2480.32 v1(3690.94,2480.32) ; U5.A17@3661.42,2559.06 v1(3690.94,2559.06) ; U1.3@4440.94,2627.95 4576.77,2627.95 4596.46,2647.64 4610.23,2647.64 C4.2@4616.14,2653.55
  Top Layer w20: v1(4291.34,3592.52) C6.2@4291.34,3633.46 ; v1(4301.18,3159.45) 4311.02,3169.29 C9.2@4311.02,3218.5 ; v1(4340.55,3592.52) R5.2@4340.55,3631.89 ; v1(4350.39,3120.08) 4358.43,3128.11 4358.43,3157.64 R11.2@4360.24,3159.45 ; v1(4370.08,2598.43) 4377.32,2605.67 4377.32,2625.35 C5.2@4379.92,2627.95 ; v1(4389.76,3690.94) 4392.81,3693.99 4435.33,3693.99 U3.4@4436.02,3694.68 ; v1(4399.61,3198.82) 4402.65,3201.87 4445.17,3201.87 U4.4@4445.87,3202.56 ; v1(4409.45,2834.65) 4419.29,2844.49 U2.2@4474.41,2844.49 ; L2.2@4419.29,2962.6 4419.29,2957.09 4421.89,2954.49 4456.93,2954.49 4458.66,2952.76 C3.2@4498.03,2952.76 4498.03,2992.13 v1(4488.19,3001.97) ; C2.2@4564.96,2736.22 v1(4606.3,2736.22) ; C4.2@4616.14,2653.55 4661.42,2653.55 v1(4665.35,2657.48) ; v1(4616.14,3562.99) C7.2@4616.14,3594.09 ; v1(4635.83,4015.75) 4655.51,3996.06 C8.2@4655.51,3964.96 ; v1(4645.67,3051.18) C10.2@4645.67,3100.39 ; v1(4675.2,3562.99) R8.2@4675.2,3592.52 ; v1(4685.04,2726.38) R2.2@4685.04,2765.75 ; v1(4694.88,3051.18) R14.2@4694.88,3100.39 ; C11.2@4724.41,3494.09 v1(4773.62,3494.09)
  Layer 3 w12: v1(3484.25,2618.11) 3484.88,2617.48 3514.41,2617.48 3536.41,2595.48 3579.73,2595.48 v2(3602.36,2618.11) 3669.57,2618.11 3672.88,2621.43 3736.84,2621.43 3773,2585.27 3773,2542.68 3759.84,2529.53 3720.47,2529.53 v1(3690.94,2559.06)
  Bottom Layer w10: P1.A16@1480,3966.1 1653.98,3966.1 1673.23,3946.85 v1(1761.81,3946.85) ; 3450.1,2593.21 3453,2596.11 3454.42,2596.11 3469.23,2610.93 3514.39,2610.93 3546.58,2578.74 3641.73,2578.74 3683.42,2620.43 4096.8,2620.43 4114.17,2637.8 4114.17,2649.81 4175.55,2711.18 4178.67,2711.18 C18.2@4192.29,2724.8 4270.08,2724.8 v1(4271.65,2726.38)
  Bottom Layer w12: C20.2@3172.44,2814.96 v1(3129.92,2814.96) 3162.92,2781.96 3162.92,2673.69 3228.35,2608.27 3297.24,2608.27 3326.77,2578.74 3435.63,2578.74 3450.1,2593.21 ; v1(3690.94,2480.32) v1(3690.94,2559.06)
XADC_VREFP: C5.1 C18.1 U1.2 U5.P12 | length 1701.2
  Top Layer w5: v1(3129.92,2775.59) U5.P12@3149.61,2755.91
  Top Layer w10: v1(4202.76,2637.8) 4229.13,2664.17 C5.1@4379.92,2664.17 ; C5.1@4376.77,2667.32 C5.1@4379.92,2664.17 ; U1.2@4535.43,2665.35 4534.84,2664.76 4380.51,2664.76 C5.1@4379.92,2664.17
  Bottom Layer w5: v1(3129.92,2775.59) 3149.42,2756.09 3149.42,2667.51 3257.69,2559.24 3435.22,2559.24 3474.41,2598.43 3503.94,2598.43 3543.31,2559.06 3651.57,2559.06 3671.44,2578.93 4134.04,2578.93 v1@4192.91,2637.8
  Bottom Layer w10: C18.1@4192.29,2688.58 4199.89,2680.98 4199.89,2667.66 4202.76,2664.8 v1(4202.76,2637.8)
pads on no net: J1.12 J1.14 J1.MH1 J1.MH2 P1.B24 PWR1.14 PWR1.15 PWR1.16 R1.0 R2.0 R3.0 R4.0 R5.0 R6.0 R7.0 R8.0 R9.0 R10.0 R11.0 R12.0 R13.0 R14.0 R15.0 U5.A3 U5.A4 U5.AA2 U5.AA3 U5.AA4 U5.AA5 U5.AA7 U5.AA8 U5.AA9 U5.AA10 U5.AA12 U5.AA14 U5.AA15 U5.AA17 U5.AA18 U5.AA19 U5.AA20 U5.AA22 U5.AA23 U5.AB1 U5.AB2 U5.AB4 U5.AB5 U5.AB6 U5.AB10 U5.AB11 U5.AB12 U5.AB14 U5.AB15 U5.AB16 U5.AB17 U5.AB19 U5.AB21 U5.AB22 U5.AC1 U5.AC2 U5.AC3 U5.AC4 U5.AC6 U5.AC8 U5.AC13 U5.AC14 U5.AC16 U5.AC17 U5.AC18 U5.AC21 U5.AC22 U5.AC23 U5.AD1 U5.AD3 U5.AD4 U5.AD5 U5.AD6 U5.AD9 U5.AD13 U5.AD14 U5.AD15 U5.AD16 U5.AD18 U5.AD23 U5.AD24 U5.AE1 U5.AE2 U5.AE3 U5.AE5 U5.AE6 U5.AE15 U5.AE16 U5.AF2 U5.AF3 U5.AF4 U5.AF5 U5.AF14 U5.AF15 U5.B1 U5.B2 U5.B3 U5.B5 U5.B6 U5.B19 U5.C2 U5.C3 U5.C4 U5.C6 U5.C9 U5.C17 U5.C18 U5.C19 U5.C23 U5.D1 U5.D2 U5.D3 U5.D5 U5.D6 U5.D8 U5.D9 U5.D10 U5.D11 U5.D13 U5.D15 U5.D16 U5.D18 U5.D19 U5.D20 U5.D23 U5.D24 U5.D25 U5.E3 U5.E4 U5.E6 U5.E10 U5.E11 U5.E12 U5.E13 U5.E15 U5.E16 U5.E17 U5.E18 U5.E20 U5.E21 U5.E23 U5.E26 U5.F1 U5.F2 U5.F5 U5.F6 U5.F8 U5.F9 U5.F10 U5.F12 U5.F13 U5.F14 U5.F17 U5.F18 U5.F19 U5.F20 U5.F22 U5.F23 U5.F24 U5.F25 U5.G2 U5.G3 U5.G4 U5.G6 U5.G9 U5.G10 U5.G11 U5.G12 U5.G14 U5.G16 U5.G17 U5.G19 U5.G20 U5.G21 U5.G22 U5.G24 U5.G25 U5.G26 U5.H1 U5.H2 U5.H3 U5.H5 U5.H6 U5.H8 U5.H9 U5.H11 U5.H12 U5.H13 U5.H14 U5.H16 U5.H17 U5.H18 U5.H19 U5.H21 U5.H22 U5.H23 U5.H24 U5.H26 U5.J3 U5.J4 U5.J6 U5.J10 U5.J11 U5.J13 U5.J14 U5.J15 U5.J16 U5.J18 U5.J19 U5.J20 U5.J21 U5.J23 U5.J24 U5.J25 U5.J26 U5.K1 U5.K2 U5.K5 U5.K6 U5.K15 U5.K16 U5.K17 U5.K18 U5.K20 U5.K21 U5.K22 U5.K23 U5.K25 U5.K26 U5.L2 U5.L3 U5.L4 U5.L6 U5.L17 U5.L18 U5.L19 U5.L20 U5.L22 U5.L23 U5.L24 U5.L25 U5.M1 U5.M2 U5.M3 U5.M16 U5.M17 U5.M19 U5.M20 U5.M21 U5.M22 U5.M24 U5.M25 U5.M26 U5.N3 U5.N4 U5.N6 U5.N12 U5.N16 U5.N17 U5.N18 U5.N19 U5.N21 U5.N22 U5.N23 U5.N24 U5.P1 U5.P2 U5.P11 U5.P16 U5.P18 U5.P19 U5.P20 U5.P23 U5.P24 U5.P25 U5.R3 U5.R4 U5.R16 U5.R17 U5.R18 U5.R20 U5.R21 U5.R22 U5.R23 U5.R25 U5.R26 U5.T7 U5.T17 U5.T18 U5.T19 U5.T20 U5.T22 U5.T23 U5.T24 U5.T25 U5.U1 U5.U2 U5.U4 U5.U5 U5.U6 U5.U7 U5.U9 U5.U16 U5.U17 U5.U19 U5.U20 U5.U21 U5.U24 U5.V1 U5.V2 U5.V3 U5.V4 U5.V6 U5.V7 U5.V8 U5.V9 U5.V11 U5.V12 U5.V13 U5.V14 U5.V16 U5.V17 U5.V18 U5.V19 U5.V21 U5.V23 U5.W1 U5.W3 U5.W4 U5.W5 U5.W6 U5.W8 U5.W9 U5.W10 U5.W11 U5.W13 U5.W14 U5.W15 U5.W16 U5.W18 U5.W19 U5.W20 U5.W21 U5.W23 U5.W24 U5.Y1 U5.Y2 U5.Y3 U5.Y5 U5.Y6 U5.Y7 U5.Y8 U5.Y10 U5.Y11 U5.Y12 U5.Y13 U5.Y15 U5.Y16 U5.Y17 U5.Y18 U5.Y20 U5.Y21 U5.Y22

## Polygon pours and split planes (outlines as drawn)
+1V8 on Layer 3 "+1V8_L03_P003" (solid, pour order 3): 2637.8,3336.61 3789.37,3336.61 4015.75,3110.24 4015.75,2106.3 3799.21,1889.76 2490.16,1889.76 2431.1,1948.82 2431.1,3248.03 2490.16,3307.09
+1V0_VCCINT_SHUNTLOW on Layer 3 "+1V0_VCCINT_SHUNTLOW_L03_P001" (solid, pour order 1): 2982.28,2687.01 3031.5,2637.8 3336.61,2637.8 3366.14,2667.32 3356.3,2677.17 3356.3,3031.5 3395.67,3070.87 3395.67,4133.86 3307.09,4222.44 3031.5,4222.44 3001.97,4192.91 3001.97,3169.29 3080.71,3090.55 3129.92,3090.55 3149.61,3070.87 3149.61,2844.49 3080.71,2775.59 2982.28,2775.59
+1V0_VCCINT_SHUNTLOW on Layer 3 "+1V0_VCCINT_SHUNTLOW_L03_P009" (solid, pour order 9): 3001.97,4192.91 3109.06,4300 4056,4300 4095,4261 4095,3925 3887,3717 3273,3717
+1V8 on Layer 3 "+1V8_L03_P008" (solid, pour order 8): 2431.1,3188.98 2490.16,3188.98 2637.8,3336.61 2637.8,3582.68 2598.43,3622.05 2401.57,3622.05 2381.89,3602.36 2381.89,3208.66
XADC_VREFN on Layer 3 "XADC_VREFN_L03_P006" (solid, pour order 6): 4202.76,4094.49 4921.26,4094.49 5000,4015.75 4990.16,4005.91 4990.16,2480.32 4901.57,2391.73 4261.81,2391.73 4232.28,2421.26 4232.28,3671.26 4163.39,3740.16 4163.39,4055.12 4173.23,4064.96
+1V8 on Bottom Layer "+1V8_L04_P005" (solid, pour order 5): 2598.43,2588.58 2598.43,2598.43 2677.17,2677.17 3021.65,2677.17 3149.61,2549.21 3444.88,2549.21 3474.41,2578.74 3503.94,2578.74 3533.46,2549.21 3769.68,2549.21 3769.68,1545.28 3671.26,1446.85 2805.12,1446.85 2805.12,1742.13 2480.32,2066.93 2480.32,2490.16 2539.37,2549.21
+1V8 on Bottom Layer "+1V8_L04_P004" (solid, pour order 4): 2952.76,3188.98 2982.28,3169.29 3307.09,3169.29 3316.93,3159.45 3316.93,2795.28 3228.35,2795.28 3228.35,2834.65 2982.28,2834.65 2864.17,2716.54 2706.69,2716.54 2706.69,2726.38 2618.11,2814.96 2618.11,3179.13 2637.8,3198.82 2647.64,3188.98 2942.91,3188.98
+1V8 on Bottom Layer "+1V8_L04_P007" (solid, pour order 7): 1663.39,4419.29 1850.39,4438.98 2519.68,3818.9 2509.84,3356.3 2391.73,3356.3 2293.31,3356.3 2293.31,3622.05 1663.39,4251.97 1663.39,4320.87
GND on Layer 2 (GND) (split plane): 5036.69,5402.62 5041.27,5401.52 5045.62,5399.72 5049.63,5397.26 5053.21,5394.21 5056.26,5390.63 5058.72,5386.62 5060.52,5382.27 5061.62,5377.69 5061.95,5373.5 5061.9,5373 5061.9,1392.25 5061.95,1391.75 5061.62,1387.56 5060.52,1382.98 5058.72,1378.64 5056.26,1374.62 5053.21,1371.04 5049.63,1367.99 5045.62,1365.53 5041.27,1363.73 5036.69,1362.63 5032.5,1362.3 5032,1362.35 1369.67,1362.35 1361.76,1370.26 1361.76,4117.39 1369.67,4125.31 1634.97,4125.31 1635.24,4125.33 1641.03,4125.66 1647.01,4126.67 1652.84,4128.35 1658.45,4130.68 1663.76,4133.61 1668.71,4137.12 1673.23,4141.17 1677.28,4145.69 1680.79,4150.64 1683.73,4155.95 1686.05,4161.56 1687.73,4167.39 1688.74,4173.37 1689.07,4179.16 1689.1,4179.43 1689.1,4186.17 1689.07,4186.45 1688.74,4192.23 1687.73,4198.22 1686.05,4204.05 1683.73,4209.65 1680.79,4214.96 1677.28,4219.91 1673.23,4224.44 1668.71,4228.48 1663.76,4231.99 1658.45,4234.93 1652.84,4237.25 1647.01,4238.93 1641.03,4239.95 1635.24,4240.27 1634.97,4240.3 1369.67,4240.3 1361.76,4248.21 1361.76,4633.14 1369.67,4641.05 1638.98,4641.05 1639.22,4641.08 1645.15,4641.41 1651.25,4642.45 1657.18,4644.16 1662.89,4646.52 1668.3,4649.51 1673.34,4653.09 1677.95,4657.2 1682.07,4661.81 1685.64,4666.85 1688.63,4672.26 1690.99,4677.97 1692.71,4683.9 1693.74,4690 1694.07,4695.93 1694.1,4696.17 1694.1,5402.9 5032,5402.9 5032.5,5402.95

## Silkscreen, mask and mechanical layers (free items; w line width, h text height)
Top Overlay:
  drawing of 2 lines, arcs and shapes, not listed
  text "ChipWhisperer" at 4163.44,2363.94 h120
  text "CW342" at 4163.44,2254.71 h120
  text "Kintex FBG676" at 4153.54,2146.45 h120
Bottom Overlay:
  lines w10: 3326.77,3218.5 3395.67,3287.4 3395.67,3956.69 3001.97,3956.69 3001.97,3188.98 3100.39,3090.55 3100.39,2908.85 3125.39,2883.86 3228.35,2883.86 3238.19,2874.02 3238.19,2805.12 3208.66,2775.59 3179.13,2775.59 3169.29,2765.75 3169.29,2627.95 3198.82,2598.43 3385.83,2598.43 3405.51,2618.11 3405.51,2726.38 3421.26,2742.13 3421.26,2946.85 3395.67,2972.44 3267.72,2972.44 3257.87,2982.28 3257.87,3149.61 3326.77,3218.5 ; 3326.77,3218.5 3326.77,3218.5
  text "VCCINT" at 3356.14,3710.79 h60
  text "C" at 4547.77,1919.29 h250
  text "W" at 4423.77,1679.29 h250
  text "p" at 4647.77,1669.29 h250
  text "Rev: 01" at 4635.83,1496.84 h120
Mechanical 1:
  lines w3.94: 1634.97,4145.4 1361.35,4145.4 1341.66,4125.72 1341.66,1361.94 1361.35,1342.25 1567.9,1342.25 1635.6,1342.25 ; 1634.97,4220.2 1361.35,4220.2 1341.66,4239.89 1341.66,4641.46 1361.35,4661.15 1566.56,4661.15 1638.98,4661.15
  lines w3.97: 1634.97,4145.4 ccw(c1634.97,4179.43) 1669,4179.43 1669,4186.17 ccw(c1634.97,4186.17) 1634.97,4220.2 ; 1638.98,4661.15 ccw(c1638.98,4696.17) 1674,4696.17 1674,4729.05
  lines w4: 1635.6,1342.25 5032,1342.25 ccw(c5032,1392.25) 5082,1392.25 5082,4971 5082,5373 ccw(c5032,5373) 5032,5423 1691,5423 ccw(c1691,5406) 1674,5406 1674,4971 1674,4729.05